# EAGLE board demo (EAGLE 9.6.2)

Size 50 x 40 mm. Coordinates in mm from the lower left corner, seen from the top.
Outline: 0,0 50,0 50,35 arc90 45,40 0,40 0,0
Copper layers used: 
Holes 3.2 mm at 4,4 46,4

## Footprints (pad centres in the part's own frame; a part is rotated, then mirrored left to right if it is on the bottom)
CPOL_RAD_2.5_5 = drill 0.8 pad 1.5 square: 1 0,0 | drill 0.8 pad 1.5: 2 2.5,0
SOT23 = smd 0.6 x 1: 1 -0.95,-1; 2 0.95,-1; 3 0,1
R_AXIAL_0207 = drill 0.8 pad 1.6: 1 0,0; 2 10.16,0
MOD_20X15 = drill 1 pad 1.8 square: 1 0,0 | drill 1 pad 1.8: 2 2.54,0; 3 5.08,0

## Placement (x,y rotation side)
C1  22uF  [CPOL_RAD_2.5_5]  35,30 0 bottom
Q1  2N7002  [SOT23]  20,10 180 top
R1  10k  [R_AXIAL_0207]  40,10 90 top
U1  Sensor  [MOD_20X15]  8,34 0 top

## Library data of the parts
C1 Q1 R1 U1 = demo

## Nets
GND: C1.2 Q1.2 U1.2
NC1: Q1.9
SIG: Q1.1 Q1.3 R1.2 U1.3
VCC: C1.1 R1.1 U1.1